# Altium PCB 1700-0002_InterfaceBoard_RevA.PcbDoc (part 2 of 2)
Units mil, origin at the board's own origin, x right, y up, seen from the top; angles counter-clockwise.
Board outline 3850 x 4150 mil, 4 copper layers (Top, GND+Signal, PWR+Signal, Bottom), stack 69.687 mil thick; 247 components, 140 nets, 790 pads, 277 vias.
Unrouted connection lines stored in the file: 103.
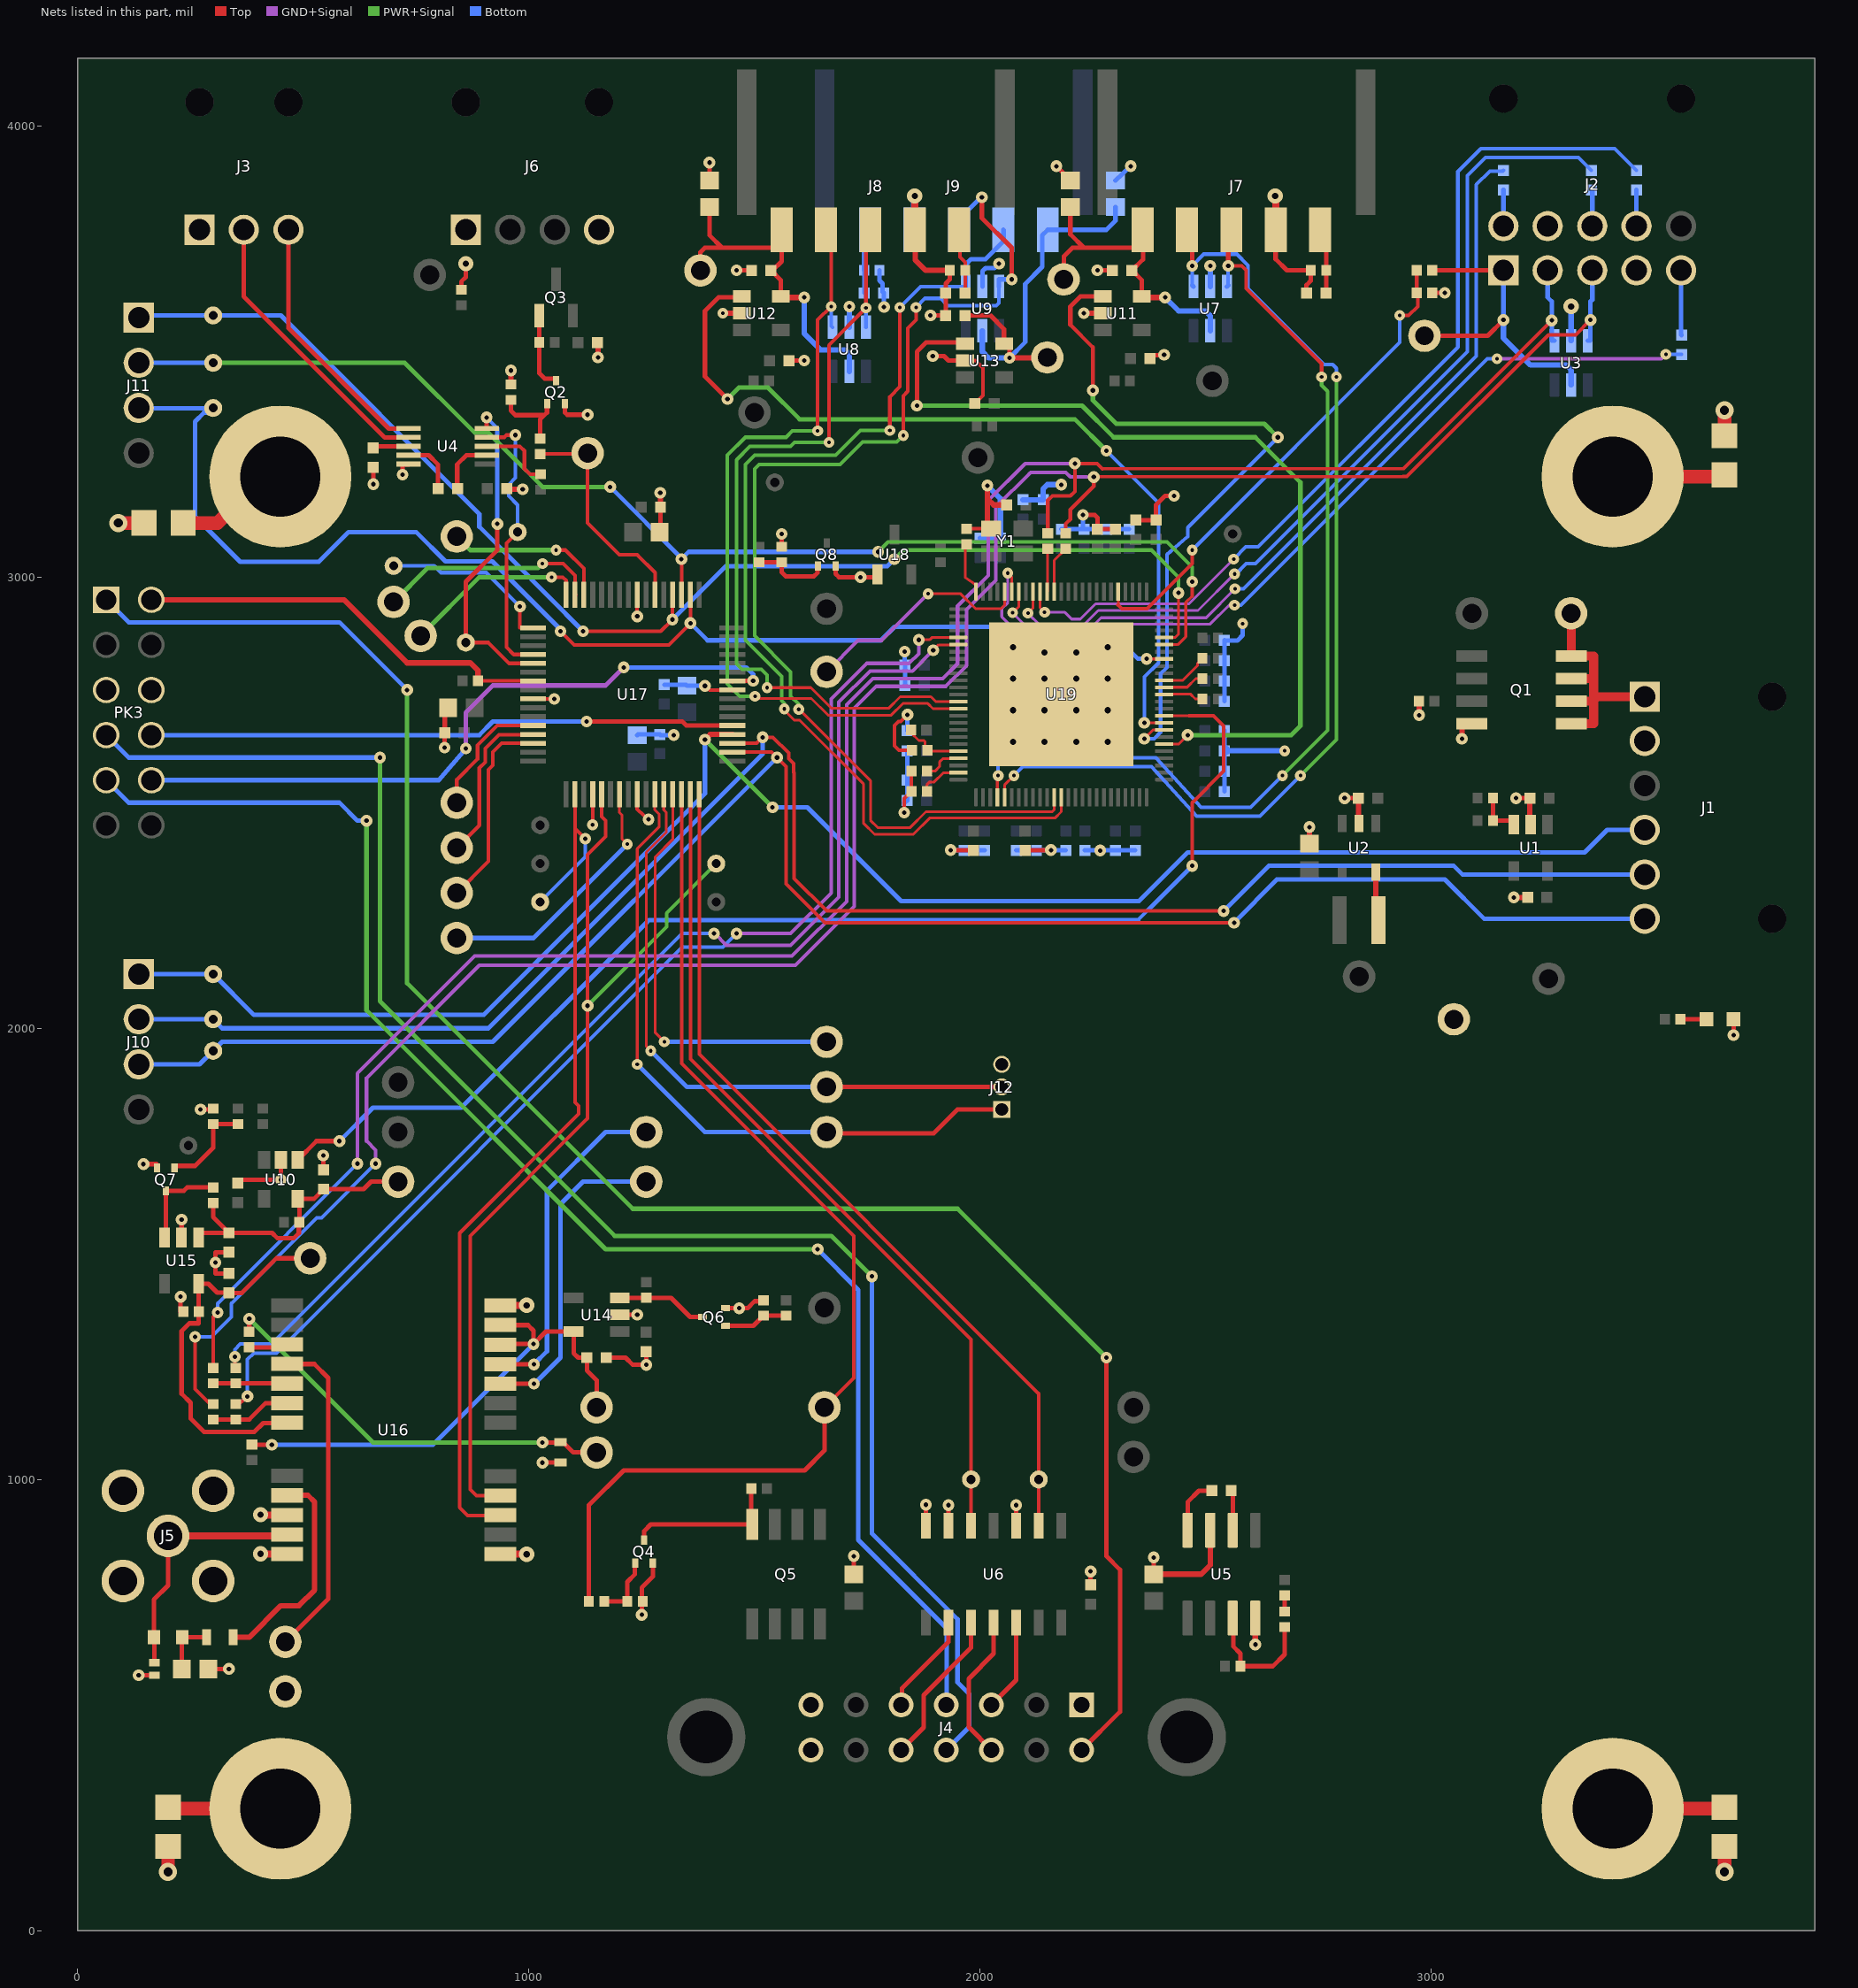
[diagram p4: the nets of this part, all layers, seen from the top]

## Via types
v1: diameter 26/26/26/26 (per signal layer), hole 10, Top to Bottom, 190 vias
v2: diameter 24/24/24/24 (per signal layer), hole 8, Top to Bottom, 54 vias
v3: diameter 34/30/30/34 (per signal layer), hole 14, Top to Bottom, 29 vias
v4: diameter 40/36/36/40 (per signal layer), hole 20, Top to Bottom, 4 vias

## Nets (pads, with @x,y where several pads share a name; then routed paths per layer and width w, separated by ;. In a path a pad name is that pad's centre, name@x,y a point inside that pad or via, vN(x,y) a via of type N, cw(c..) or ccw(c..) an arc to the next point about the centre after c; other vN are vias at no path point) (continued)
GND: 5V_ON.1 C1.2 C2.2 C4.2 C5.2 C6.2 C7.2 C8.2 C9.2 C10.2 C11.2 C12.2 C13.2 C14.2 C15.2 C16.2 C17.2 C18.2 C19.2 C20.2 C21.2 C22.2 C23.2 C24.2 C25.2 C26.2 C27.2 C28.2 C29.2 C30.2 C31.2 C32.2 C33.2 C34.2 C35.2 C36.2 C37.2 C38.2 C39.2 C40.2 C41.2 C42.2 C43.2 C44.2 C45.2 C46.2 C47.2 C48.2 C49.2 C50.2 C51.2 C52.2 C53.2 C54.2 C55.2 C56.2 C58.2 C59.2 C60.1 C61.2 C62.2 C65.1 C66.2 C67.1 C70.2 C71.2 C72.2 C73.2 C74.2 C75.2 C77.2 C78.2 C79.2 C80.2 C81.2 CR1.2 GND.P$1 GNSSGND.P$1 GNSSPULSE.1 J1.2 J2.4 J2.7 J3.1 J4.1 J4.13 J4.14 J5.2 J5.3 J5.4 J5.5 J6.1 J6.4 J7.4 J8.4 J9.4 J12.3 PK3.5 PK3.6 Q1.4 Q2.2 Q4.2 Q6.2 Q7.2 Q8.2 R8.1 R9.2 R10.2 R14.2 R15.2 R21.1 R23.1 R25.2 R31.2 R32.2 R34.2 R40.2 R48.2 R49.2 R50.2 R51.2 R52.1 R53.1 R54.1 R55.1 U1.2 U2.2 U3.2 U4.10 U5.3 U5.8 U6.3 U6.6 U6.7 U7.2 U8.2 U9.2 U10.2 U11.2 U12.2 U13.2 U14.2 U15.2 U16.10 U16.12 U16.13 U16.24 U17.9 U17.20 U17.25 U17.41 U17.56 U18.1 U19.101 Y1.2 | length 7887.5
  Top w8: U17.9@1009,2730.16 1059.84,2730.16 v1(1056,2730) ; v2(1141,2451) 1141.42,2474.58 U17.20@1141.42,2519 ; U17.25@1239.84,2519 1239.84,2486.16 1255,2471 v1(1265,2463) ; U17.56@1239.84,2961 1239.84,2915.16 v1(1240,2913) ; C27.2@1289.53,3100 C27.2@1291.5,3101.97 ; v1@1391,2759 1400,2750 U17.41@1450.84,2750 ; v1(1832,2478) 1832,2509.13 R15.2@1847.87,2525 R34.2@1847.87,2570 ; v1(1839,2695) 1824,2680 1819,2680 1810,2671 1810,2626 1820,2616 R14.2@1848.87,2616 ; C65.1@1923.5,3630 C65.1@1924,3633.5 ; U13.2@1966.69,3480 1990,3480 2006,3464 2006,3402.5 C62.2@1988.5,3385 ; R21.1@1970,3107.13 2024.13,3107.13 Y1.2@2024.57,3107.56 ; C55.2@2260,3106.5 C55.2@2270,3106.5
  Top w10: v1(135,566) CR1.2@170,566 ; v1(145.5,1699) 175,1699 Q7.2@175.5,1690.5 ; v1(228,1405) 228,1372.13 R9.2@233.87,1372 ; U15.2@230,1536.18 v1(230,1576) ; v1(272,1820) 297.87,1820 R49.2@300,1822.13 ; C26.2@289.53,580 v1(335,580) ; C20.2@335,1456.5 305,1456.5 v1(305,1481) 305,1503.5 C19.2@335,1503.5 ; C71.2@355,1656.5 362.5,1664 v1(450,1664) U10.2@450,1708.31 ; v1(544,1718) 544,1686.5 C43.2@545,1686.5 ; v1(655,3206) C13.2@655,3243.5 ; v1(720,3227) 720,3250 733.25,3250 U4.10@733.25,3250.63 ; v1(813,2622) 813,2654.5 C2.2@813.5,2655 813.5,2703.03 C10.2@820.47,2710 ; R10.2@850,3637.13 850,3655 860,3665 v3(860,3695) ; C12.2@950,3195.5 C12.2@950.5,3196 C12.2@951.5,3195 ; v1(1030,1037) 1030.25,1037.25 GNSSPULSE.1@1070,1037.25 ; Q2.2@1079.5,3384.5 1080,3384 1080,3365 1085,3360 v1(1130,3360) ; C75.2@1151.5,3520 C75.2@1153,3520 ; C59.2@1171.5,1270 1214,1270 1230,1254 v1(1260,1254) C50.2@1260,1283.5 ; U14.2@1201.18,1365 v1(1240,1365) ; v1(1250,700) R48.2@1250,730 ; R48.2@1252.13,730 R48.2@1250,730 ; Q4.2@1274.5,814.5 1275,814 1275,785 1250,760 R48.2@1250,730 ; v1(1291,3187) v1@1291.5,3188.5 ; C27.2@1291.5,3101.97 C11.2@1291.5,3155 ; v1(1390,2759) v1@1391,2759 ; C52.2@1400,3879.53 v1(1400,3919) ; Q6.2@1435.5,1379.5 v1(1466,1379.5) 1484.5,1379.5 1500,1395 1517.87,1395 R50.2@1520,1397.13 ; U17.41@1450.84,2750 U17.41@1451,2749.84 ; v1(1460,3680) C61.2@1493.5,3680 ; R51.2@1560,3067.13 v1(1560,3096) ; C58.2@1576.5,3480 v1(1610,3480) ; Q8.2@1679.5,3024.5 1679.5,3007.5 1687,3000 v1(1735,3000) 1766.6,3000 U18.1@1772.6,3006 ; C56.2@1720,789.53 v1(1720,830) ; J8.4@1854.72,3770 J8.4@1871,3753.72 ; U6.7@1880,897.25 v1(1880,944) ; v1(1890,3580) C66.2@1923.5,3580 1924,3583.5 1924,3633.5 1924,3651 1932.87,3659.87 R32.2@1932.87,3680 ; v1(1895,3490) 1920,3490 1930,3480 U13.2@1966.69,3480 ; U6.6@1930,897.25 v1(1930,943) ; v1(1935,2395) 1955.5,2394.5 C44.2@1985,2394.5 ; Y1.2@2016,3106.13 2022.13,3100 Y1.2@2024.57,3107.56 ; U6.3@2080,897.25 v1(2080,943) ; C53.2@2100,2394.5 2156.5,2394.5 v1(2157,2395) ; v1(2169,3911) 2200,3881 C70.2@2200,3879.53 ; U19.101@2180,2740 2213,2707 v3(2213,2705) ; v3(2213,2635) v3(2283,2635) ; v3(2213,2833) v3(2143,2833) v3(2143,2775) v3(2283,2775) v3(2283,2845) ; v1(2228,3138) 2254,3138 2260,3132 C55.2@2260,3106.5 ; v1@2230,3580 v1(2230,3585) ; C34.2@2245,766.5 v1(2245,796) ; v1(2260,3680) C54.2@2293.5,3680 ; C55.2@2270,3106.5 C25.2@2300,3106.5 C25.2@2300,3110 ; C47.2@2345,3126.5 C29.2@2390,3126.5 2390,3160 2410,3180 v1(2430,3180) ; C33.2@2376.5,3485 2383.5,3492 2402,3492 v1(2408,3493) ; v1(2385,827) C32.2@2385,789.53 C32.2@2385.47,790 ; J7.4@2655.28,3770 2655,3769.72 2655,3705 2680,3680 R40.2@2732.87,3680 ; C67.1@2723.5,3630 2723.5,3647.5 2733,3657 2733,3679.87 R40.2@2732.87,3680 ; R40.2@2723.5,3680 R40.2@2732.87,3680 ; v1(2808,2510) C74.2@2838.5,2510 ; U2.2@2838.5,2455.25 U2.2@2840,2453.75 ; R23.1@3002.13,3630 v1(3030,3630) ; Q1.4@3089.76,2670 Q1.4@3089.76,2675 ; v1(3188,2510) C72.2@3218.5,2510 ; U1.2@3218.5,2452.68 U1.2@3220,2451.18 ; v1(3670,1985) 5V_ON.1@3670,2020
  Top w12: C12.2@951.5,3195 v1(986,3195) ; R31.2@960,3427.13 v1(960,3458) ; v1(1153,3487) C75.2@1153,3520 ; C11.2@1291.5,3155 v1@1291.5,3188.5 ; v2(1430,3585) U12.2@1471.69,3585 ; J8.4@1854.72,3770 1856,3768.72 1856,3703 1879,3680 R32.2@1932.87,3680 ; Y1.2@2016,3106.13 2016,3174 ; v1(2016,3203) 2016,3174 ; C49.2@2058.5,3160 2030,3160 2016,3174 ; v1(2230,3585) U11.2@2271.69,3585 ; C32.2@2385.47,790 2490,790 2510,810 U5.3@2510,887.44 ; v1(2610,634) U5.8@2610,692.56 ; C80.2@2730,2409.53 v1(2730,2446) ; U2.2@2838.5,2455.25 C74.2@2838.5,2510 ; R8.1@2972.87,2725 2973.13,2720.87 v1(2973,2694) ; v1(3068,2642) 3068,2670 Q1.4@3089.76,2670 ; v1(3183,2290) C73.2@3213.5,2290 ; U1.2@3218.5,2452.68 C72.2@3218.5,2510
  Top w16: v3(405,835) 408.43,834.57 U16.12@463.76,834.57 ; v3(405,922) 407.81,921.19 U16.10@463.76,921.19 ; U16.13@936.24,834.25 985.75,834.25 v3(995,834) ; U16.24@936.24,1385.43 998.43,1385.43 v3(995,1386) ; v3(1855,3845) 1855.28,3844.72 J8.4@1855.28,3770 ; v3(2654,3845) 2655.28,3843.72 J7.4@2655.28,3770
  Top w30: v4(90,3120) R53.1@146.69,3120 ; v4(200,130) R54.1@200,186.69 ; v4(3650,130) R55.1@3650,186.69 ; R52.1@3650,3313.31 v4(3650,3370)
  Bottom w8: v1(1832,2478) C41.2@1832,2499.5 ; C41.2@1835,2505 C41.2@1838.5,2505
  Bottom w10: C79.2@1240,2649.53 1241.97,2651.5 C78.2@1290,2651.5 1291.5,2650 v1(1321,2650) ; C1.2@1300,2761.5 1348.03,2761.5 C77.2@1350,2759.53 1389.47,2759.53 v1(1390,2759) ; R25.2@1777.13,3680 1777.13,3657.87 1784,3651 1784,3632.5 C60.1@1786.5,3630 1786.5,3603.5 v1(1787,3599) ; C41.2@1832,2499.5 C41.2@1838.5,2505 C42.2@1838.5,2615 C36.2@1838.5,2550 C36.2@1839,2550 ; v1(1833,2835) 1833,2810.5 C30.2@1833.5,2805 C46.2@1833.5,2760 ; C35.2@1838.5,2660 1838.5,2694.5 v1(1839,2695) ; v1(1935,2395) 1955.5,2394.5 C4.2@1965,2394.5 C7.2@2010,2394.5 ; C5.2@2000,3086.5 C8.2@2045,3086.5 ; U9.2@2005,3644 2005,3678 2012,3685 2032,3685 v1(2042,3695) ; C39.2@2080,2394.5 C38.2@2124.5,2394.5 ; C38.2@2125,2394.5 C38.2@2124.5,2394.5 ; C24.2@2180,3106.5 C22.2@2230,3106.5 ; C48.2@2190,2394.5 2157.5,2394.5 v1(2157,2395) 2125,2395 C38.2@2124.5,2394.5 ; C22.2@2224,3106.5 C22.2@2228,3106.5 ; v1(2228,3138) C22.2@2228,3106.5 ; C28.2@2232,2394.5 2266.5,2394.5 v1(2266,2394) 2267.5,2394.5 C21.2@2300,2394.5 C81.2@2344,2394.5 ; C51.2@2300,3879.53 2332.53,3909.53 v1(2334,3911) ; C16.2@2330,3106.5 C23.2@2280,3106.5 C22.2@2230,3106.5 ; C9.2@2541.5,2525 C6.2@2541.5,2570 C45.2@2541.5,2615 C31.2@2541.5,2660 ; C14.2@2541.5,2725 C17.2@2541.5,2770 C15.2@2541.5,2815 C18.2@2541.5,2860 2558.5,2859.5 2570.5,2859.5 2582,2871 v2(2582,2897) ; C22.2@2228,3106.5 C22.2@2230,3106.5
  Bottom w12: U8.2@1710,3554 v1(1710,3600) ; v1(2016,3203) 2045,3174 C8.2@2045,3086.5 ; C40.2@2095,3171.5 C37.2@2140,3171.5 2140,3196 2149,3205 v1(2180,3205) ; U7.2@2510,3644 v1(2510,3690) ; C45.2@2541.5,2615 2546.5,2620 2547,2612 2550,2615 v2(2675,2615) ; U3.2@3310,3524 v3(3310,3600)
  Bottom w16: J9.4@1854.72,3770 1854.72,3844.72 v3(1855,3845)
  other v3: 2073,2635 2143,2635 2073,2705 2143,2705 2283,2705 2073,2775 2213,2775 2073,2845
GNSS_ANT: CR1.1 J5.1 L2.1 U16.11 | length 559.6
  Top w10: CR1.1@170,594 170,648.5 L2.1@168.5,650 168.5,733.5 200,765 J5.1@200,875
  Top w16: J5.1@200,875 460.88,875 U16.11@463.76,877.88
GNSS_ANT_DET: GNSSANTDET.P$1 GNSSANTDET.P$2 U16.15 U17.18 | length 2081.6
  Top w8: U16.15@936.24,920.86 935.38,920 864,920 846,938 846,1546 1110,1810 1110,1828 1102.05,1835.95 U17.18@1102.05,2519 1102.05,2442.95 v1(1125,2420)
  Bottom w8: GNSSANTDET.P$2@1025,2280 1125,2380 v1(1125,2420)
GNSS_ANT_OK: GNSSANTOK.P$1 GNSSANTOK.P$2 U16.16 U17.21 | length 2174.1
  Top w8: U16.16@936.24,964.17 936.08,964 884,964 870,978 870,1540 1130,1800 v1(1130,2050) 1130,2385 1170,2425 1170,2460 1161.1,2468.9 U17.21@1161.1,2519
  PWR+Signal w8: v1(1130,2050) 1305,2225 1305,2255 GNSSANTOK.P$2@1415,2365
GNSS_VCC_3V3: C59.1 GNSS3V3.P$1 R7.2 U14.5 U16.22 U16.23 | length 1199.9
  Top w10: R7.2@386,1077.13 429.87,1077.13 v1(430,1077) ; U16.22@936.24,1298.81 937.43,1300 v1(1010,1300) ; U16.23@936.24,1342.12 997.88,1342.12 1010,1330 v1(1010,1300) ; GNSS3V3.P$1@1150,1160 1150,1220 1128.5,1241.5 C59.1@1128.5,1270 1109,1270 1099,1280 1099,1327.42 U14.5@1098.82,1327.6 1037.6,1327.6 v1(1010,1300)
  Bottom w10: v1(430,1077) 787,1077 v1(1010,1300)
GNSS_VDDUSB_3V3: C20.1 GNSSVDDU.P$1 R9.1 U15.5 U16.7 | length 858
  Top w10: U16.7@463.76,1125.91 462.84,1125 411,1125 391,1105 280,1105 250,1135 250,1170 230,1190 230,1329 247,1346 268,1346 268.13,1361.13 R9.1@268.13,1372 268.13,1433.09 U15.5@267.4,1433.82 289.18,1433.82 309,1414 334.5,1414 C20.1@335,1413.5 363.5,1413.5 440,1490 GNSSVDDU.P$1@515,1490
MB_PWR_EN: MBPWREN.P$1 R1.1 U17.30 | length 2425.2
  Top w8: U17.30@1338.27,2519 1338.27,1921.73 1720,1540 1720,1225 MBPWREN.P$1@1655,1160
  Top w10: R1.1@1132.87,730 1132.87,942.87 1210,1020 1611,1020 1655,1064 MBPWREN.P$1@1655,1160
N$1: L1.2 U2.5 | length 112.1
  Top w10: L1.2@2877.4,2240 L1.2@2883.25,2240
  Top w12: L1.2@2877.4,2240 U2.5@2877.4,2346.25
N$2: C3.1 U4.9 | length 127.4
  Top w10: U4.9@733.25,3270.31 777.68,3270.32 798,3250 798,3196.5 C3.1@798.5,3196
N$3: PTH1.P$1 R52.2 | length 249.5
  Top w30: PTH1.P$1@3402,3223 3646.31,3223 R52.2@3650,3226.69
N$4: C3.2 U4.2 | length 128.4
  Top w10: C3.2@841.5,3196 841,3196.5 841,3250 861.32,3270.32 U4.2@906.75,3270.31
N$5: C13.1 U4.8 | length 79.7
  Top w10: C13.1@655,3286.5 658.5,3290 U4.8@733.25,3290
N$6: R29.2 R30.1 U1.3 | length 104.3
  Top w10: R30.1@3137.13,2510 R29.2@3137.13,2460 3182.6,2460 U1.3@3182.6,2451.18
N$7: PIC_RF6.P$1 U17.12 | length 287.3
  Top w8: PIC_RF6.P$1@840,2500 840,2551 886,2597 886,2627 930.1,2671.1 U17.12@1009,2671.1
N$8: PTH2.P$1 R53.2 | length 258.4
  Top w30: R53.2@233.31,3120 310,3120 340,3150 376,3150 PTH2.P$1@449,3223
N$9: Q2.3 Q3.1 R5.1 | length 172.2
  Top w10: Q3.1@1022.6,3580 1022.87,3580 R5.1@1022.87,3520 1023,3519.87 1023,3452 1035,3440 1055.5,3440 Q2.3@1060,3435.5
N$10: Q2.1 R31.1 R41.1 | length 185.8
  Top w10: R31.1@960,3392.87 960,3369 970,3359 1034,3359 ; R41.1@1025,3307.13 1025,3350 1034,3359 ; Q2.1@1040.5,3384.5 1040,3384 1040,3365 1034,3359
N$11: R2.1 R45.1 U16.6 | length 178.8
  Top w10: R45.1@300,1132.87 R2.1@350,1132.87 350.13,1133 380,1133 416.22,1169.22 U16.6@463.76,1169.22
N$12: R3.1 R46.1 U16.5 | length 171.5
  Top w8: R3.1@347,1210.13 R3.1@350,1212.87
  Top w10: R46.1@300,1212.87 R3.1@350,1212.87 463.41,1212.87 U16.5@463.76,1212.53 U16.5@461.23,1210
N$13: Q6.3 R6.1 U14.3 | length 201.5
  Top w10: U14.3@1201.18,1402.4 R6.1@1259.53,1402.4 ; R6.1@1260,1402.87 R6.1@1259.53,1402.4 ; Q6.3@1384.5,1360 1357.4,1360 1315,1402.4 R6.1@1259.53,1402.4
N$14: GNSSTX.P$1 U16.20 | length 708.6
  Top w10: U16.20@936.24,1212.2 1010.8,1212.2 v1(1011,1212)
  Bottom w10: v1(1011,1212) 1012,1212 1070,1270 1070,1610 1120,1660 GNSSTX.P$1@1260,1660
N$15: PTH3.P$1 R54.2 | length 252.3
  Top w30: R54.2@200,273.31 200,270 PTH3.P$1@449,270
N$16: Q6.1 R35.2 R50.1 | length 143.8
  Top w10: Q6.1@1435.5,1340.5 1497.63,1340.5 R50.1@1520,1362.87 R35.2@1570,1362.87
N$17: Q7.3 R47.2 U15.3 | length 213.9
  Top w10: U15.3@192.6,1536.18 195,1536.18 Q7.3@195,1639.5 195.5,1640 235,1640 242.13,1647.13 R47.2@300,1647.13
N$18: C60.2 J9.5 R25.1 | length 145.8
  Bottom w10: C60.2@1743.5,3630 1743.5,3679.37 R25.1@1742.87,3680 1742.87,3756.57 J9.5@1756.3,3770
N$19: PTH4.P$1 R55.2 | length 251.3
  Top w30: PTH4.P$1@3402,270 3650,270 R55.2@3650,273.31
N$20: TXD2.P$1 U17.4 | length 331.2
  Top w8: TXD2.P$1@975,3100 950,3075 950,2845 966.42,2828.58 U17.4@1009,2828.58
N$21: Q4.3 Q5.4 R13.2 | length 347.8
  Top w10: Q4.3@1255,865.5 1255,885.24 1270,900.24 Q5.4@1495,900.24 1492.87,900.24 R13.2@1492.87,980
N$22: C65.2 J8.5 R32.1 | length 146.2
  Top w8: J8.5@1953.7,3770 1955,3768.7 1955,3710 1967.13,3697.87 R32.1@1967.13,3680 1967.13,3630 C65.2@1966.5,3630
N$23: R37.1 R39.2 U5.7 | length 283.2
  Top w10: U5.7@2560,692.56 2561,691.56 2561,630 2577.13,613.87 R37.1@2577.13,586 2649,586 2675,612 R39.2@2675,672.87
N$24: C69.1 J2.9 | length 80.5
  Bottom w10: J2.9@3455,3778 C69.1@3455,3858.5
N$25: C68.1 J2.8 | length 81.3
  Bottom w10: C68.1@3355,3858.5 3357,3856.5 J2.8@3357,3778
N$26: C64.1 J2.6 | length 80.5
  Bottom w10: J2.6@3160,3778 C64.1@3160,3858.5
N$27: C63.1 J2.5 | length 143.9
  Bottom w10: J2.5@3554,3680 3554,3537.5 C63.1@3555,3536.5
N$28: R14.1 R24.2 U19.21 | length 136.7
  Top w6: R24.2@1846.87,2661 1846.87,2655.13 1864,2638 1876,2638 1878,2636 1878,2621.13 R14.1@1883.13,2616 1885.11,2614.02 U19.21@1952,2614.02
N$29: R34.1 U19.22 | length 87.4
  Top w6: R34.1@1882.13,2570 1900,2570 1910,2580 1910,2590 1918,2598 1951.73,2598 U19.22@1952,2598.27
N$30: R15.1 U19.24 | length 96
  Top w6: R15.1@1882.13,2525 1882.13,2540.13 1888,2546 1898,2546 1918,2566 1951.23,2566 U19.24@1952,2566.77
N$31: R20.2 U19.63 | length 89.8
  Top w6: U19.63@2408,2740 2409,2741 2466,2741 2477,2730 R20.2@2492.87,2730
N$32: R19.2 U19.65 | length 108
  Top w6: U19.65@2408,2771.5 2449.5,2771.5 2482,2804 2482,2809.13 R19.2@2492.87,2820
N$33: R21.2 U19.100 | length 120.9
  Top w6: R21.2@1970,3072.87 1967.13,3072.87 1967,3073 1967,2999 1991.02,2983 U19.100@1991.02,2968
N$34: R16.2 U19.64 | length 92.8
  Top w6: U19.64@2408,2755.75 2408.25,2756 2459,2756 2478,2775 R16.2@2492.87,2775
N$35: ATEST.P$1 U19.96 | length 512.6
  Top w6: v2(1885,2963) 1957,2963 1990,2930 2046,2930 2054.02,2938.02 U19.96@2054.02,2968
  GND+Signal w8: ATEST.P$1@1660,2790 1730,2860 1782,2860 v2(1885,2963)
N$36: Q4.1 R1.2 R48.1 | length 142.9
  Top w10: R1.2@1167.13,730 R48.1@1217.87,730 ; R48.1@1217.5,730 R48.1@1217.87,730 ; Q4.1@1235.5,814.5 1235,814 1235,790 1217.87,772.87 R48.1@1217.87,730
N$37: PIC_RF5.P$1 U17.13 | length 365
  Top w8: PIC_RF5.P$1@840,2400 890,2450 890,2577 903,2590 903,2620 934,2651 1007.58,2651 U17.13@1009,2651.42
N$38: GNSSRX.P$1 U16.21 | length 745.8
  Top w10: U16.21@936.24,1255.51 1010.49,1255.51 v1(1011,1255)
  Bottom w10: v1(1011,1255) 1040,1284 1040,1640 1170,1770 GNSSRX.P$1@1260,1770
N$39: PIC_RF4.P$1 U17.14 | length 442.3
  Top w8: PIC_RF4.P$1@840,2300 910,2370 910,2573 920,2583 920,2612 939.73,2631.73 U17.14@1009,2631.73
N$40: PIC_RA1.P$1 U17.23 | length 582.4
  Top w6: U17.23@1200.47,2519 1200.47,2478.53 1206,2473 1206,2420 v2(1218,2408)
  Bottom w10: PIC_RA1.P$1@840,2200 1010,2200 v2(1218,2408)
N$41: R33.1 U16.3 | length 86.4
  Top w10: R33.1@380,1292.87 457.49,1292.87 U16.3@463.76,1299.14
N$42: GNSSINT.P$1 U16.4 | length 728.4
  Top w10: GNSSINT.P$1@460,640 555,735 555,1225 524.17,1255.83 U16.4@463.76,1255.83
N$43: RXD2.P$1 U17.5 | length 168.1
  Top w8: RXD2.P$1@860,2855 910,2855 956.1,2808.9 U17.5@1009,2808.9
N$44: R12.1 R39.1 | length 35.7
  Top w10: R39.1@2675,707.13 R12.1@2675,742.87
N$45: C76.1 U5.2 | length 89
  Top w10: C76.1@2556.5,975 2560,971.5 U5.2@2560,887.44
N$46: C76.2 U5.4 | length 126.4
  Top w10: U5.4@2460,887.44 2460,950 2485,975 C76.2@2513.5,975
N$47: SS2AUX.P$1 U17.1 | length 393.6
  Top w8: v1(980,2935) 980,2887.64 U17.1@1009,2887.64
  Bottom w8: SS2AUX.P$1@700,3025 790,3025 805,3010 905,3010 v1(980,2935)
N$48: J12.1 PIC_RA5.P$1 U17.27 | length 1516.7
  Top w6: v2(1240,1920) 1240,2398 1289,2447 1289,2474 1279.21,2483.79 U17.27@1279.21,2519
  Top w10: PIC_RA5.P$1@1660,1770 1663,1767 1897,1767 1950,1820 J12.1@2048,1820
  Bottom w10: v2(1240,1920) 1390,1770 PIC_RA5.P$1@1660,1770
N$49: J12.2 PIC_RA4.P$1 U17.28 | length 1404.6
  Top w6: v2(1270,1950) 1260,1960 1260,2390 1304,2434 1304,2479 1298.9,2484.1 U17.28@1298.9,2519
  Top w10: PIC_RA4.P$1@1660,1870 J12.2@2048,1870
  Bottom w10: v2(1270,1950) 1350,1870 PIC_RA4.P$1@1660,1870
N$50: 5V_ON.2 R56.1 | length 57.9
  Top w10: R56.1@3552.13,2020 5V_ON.2@3610,2020
N$51: GNSSPLS.P$1 GNSSPULSE.2 R33.2 | length 921.9
  Top w10: R33.2@380,1327.13 v1(380,1356) ; v1(1030,1082) 1067.25,1082 GNSSPULSE.2@1070,1082.75 1075.25,1082.75 1098,1060 GNSSPLS.P$1@1150,1060
  PWR+Signal w10: v1(380,1356) 654,1082 v1(1030,1082)
N$52: C67.2 J7.5 R40.1 | length 145.8
  Top w10: J7.5@2753.7,3770 2767.13,3756.57 R40.1@2767.13,3680 2767.13,3630.63 C67.2@2766.5,3630
N$53: PIC_RC1.P$1 U17.29 | length 933.3
  Top w6: v2(1300,1970) 1280,1990 1280,2380 1318.58,2418.58 U17.29@1318.58,2519
  Bottom w10: v2(1300,1970) PIC_RC1.P$1@1660,1970
N$54: PIC_RE2.P$1 U17.64 | length 410.9
  Top w8: v2(1050,3000) 1075,3000 1082.36,2992.64 U17.64@1082.36,2961
  PWR+Signal w10: PIC_RE2.P$1@760,2870 890,3000 v2(1050,3000)
N$55: PIC_RE3.P$1 U17.63 | length 491
  Top w8: v2(1030,3030) 1076,3030 1102,3004 U17.63@1102.05,2961
  Top w10: U17.63@1102.05,2961 U17.63@1102.05,2961
  PWR+Signal w10: PIC_RE3.P$1@700,2945 775,3020 1020,3020 v2(1030,3030)
N$56: PIC_RE4.P$1 U17.62 | length 369.5
  Top w8: v2(1060,3060) 1081,3060 1122,3019 1122,2961.27 U17.62@1121.73,2961
  PWR+Signal w10: PIC_RE4.P$1@840,3090 870,3060 v2(1060,3060)
N$57: R44.1 U4.3 | length 168.3
  Top w8: U4.3@906.75,3290 980,3290 990,3280 990,3240 1001.87,3228.13 R44.1@1026,3228.13
N$59: C26.1 L2.2 R57.1 | length 124.1
  Top w10: C26.1@230.47,580 230.47,646.02 L2.2@231.5,650 R57.1@285.47,650
PC_USB2_HOST_DM: J2.2 R43.2 R46.2 U3.1 | length 4930.9
  Top w6: R43.2@2150,3096.13 R43.2@2150,3097.13
  Top w8: R46.2@300,1247.13 300,1360 v1(310,1370) ; R43.2@2150,3097.13 2150,3170 2160,3180 2200,3180 2210,3190 v1(2210,3252) 2259,3252 2271,3240 2939,3241 v1(3267,3569)
  GND+Signal w8: v1(620,1700) 620,1900 880,2160 1583,2160 1704,2281 1704,2717 1762,2775 1917,2775 1950,2808 1950,2936 2018,3004 2018,3170.5 2100,3252 v1(2210,3252)
  Bottom w8: v1(310,1370) 310,1390 v1(620,1700)
  Bottom w10: J2.2@3258,3680 3258,3620 3267,3611 v1(3267,3569) 3267,3524 U3.1@3273,3524
PC_USB2_HOST_DP: J2.3 R18.2 R45.2 U3.3 | length 5100.5
  Top w8: v1(260,1316) 260,1200 292.87,1167.13 R45.2@300,1167.13 ; R18.2@2190,3097.13 2190,3118 2200,3128 2200,3150 2252,3202 v1(2252,3222) 2938,3223 2946,3223 3260,3537 3320,3537 v1(3353,3570)
  GND+Signal w8: v1(660,1700) 660,1730 640,1750 640,1890 890,2140 1591,2140 1721,2270 1721,2709 1770,2758 1924,2758 1970,2804 1970,2928 2035,2993 2035,3156 2109.84,3230.16 2112,3232 2190,3232 2200,3222 v1(2252,3222)
  Bottom w8: v1(260,1316) 296,1316 340,1360 340,1390 530,1580 540,1580 v1(660,1700)
  Bottom w10: U3.3@3347,3524 3353,3524 v1(3353,3570) 3353,3611 3357,3615 J2.3@3357,3680
PC_VBUS: J2.1 PCVBUS.P$1 R22.2 U3.5 | length 710.4
  Top w10: PCVBUS.P$1@2985,3535 3125,3535 v1(3160,3570) ; R22.2@3002.13,3680 J2.1@3160,3680
  Bottom w10: v1(3160,3570) J2.1@3160,3680
  Bottom w12: v1(3160,3570) 3160,3530 3220,3470 3300,3470 3310,3460 U3.5@3310,3426
PRT_CTL1: U10.1 U19.60 | length 2733.2
  Top w6: U19.60@2408,2692.76 2408.24,2693 2463,2693
  Top w8: 2463,2693 2517,2693 2540,2670 2540,2570 2470,2500 v1(2470,2360)
  Top w10: U10.1@487.4,1708.31 529.09,1750 v1(580,1750)
  Bottom w8: 2350,2240 2372,2262
  Bottom w10: v1(580,1750) 654,1824 850,1824 1258,2232 1266,2240 2350,2240 ; 2372,2262 v1(2470,2360)
PRT_CTL2: U11.1 U19.58 | length 1610.9
  Top w6: v1(2364,2642) 2383,2661 2388.74,2661 U19.58@2408,2661.26
  Top w8: 2200,3560 2250,3510 v1(2250,3414)
  Top w10: 2200,3560 2200,3600 2222.4,3622.4 U11.1@2271.69,3622.4
  PWR+Signal w10: v1(2250,3414) 2250,3392 2302,3340 2630,3340 v1(2660,3310)
  Bottom w8: v1(2364,2642) 2386,2642 2400,2656 2400,2786 2414,2800 2414,3050 2460,3090 2460,3110 v1(2660,3310)
PRT_CTL3: U12.1 U19.59 | length 1927.8
  Top w6: v1(2364,2677) 2366.99,2677.01 U19.59@2408,2677.01
  Top w8: U12.1@1469.29,3620 U12.1@1471.69,3622.4
  Top w10: v1(1440,3395) 1390,3445 1390,3590 1420,3620 U12.1@1469.29,3620
  PWR+Signal w10: v1(1440,3395) 1465,3420 1530,3420 1600,3350 2210,3350 v1(2280,3280)
  Bottom w8: v1(2280,3280) 2396,3164 2396,2810 2364,2779 v1(2364,2677)
PRT_CTL4: U13.1 U19.56 | length 2015.1
  Top w6: U19.56@2408,2629.76 2439.76,2629.76 v1(2460,2650)
  Top w10: v1(1860,3380) 1860,3500 1880,3520 1964.09,3520 U13.1@1966.69,3517.4
  PWR+Signal w10: v1(1860,3380) 2226,3380 2296,3310 2610,3310 2710,3210 2710,2670 2690,2650 v1(2460,2650)
PWR_BYP2: Q7.1 R11.2 R49.1 | length 214.4
  Top w10: Q7.1@214.5,1690.5 214.5,1695 260,1695 300,1735 R49.1@300,1787.87 R11.2@355,1787.87
PWR_BYP3: Q8.1 R36.2 R51.1 | length 173.6
  Top w10: R36.2@1510,3032.87 R51.1@1560,3032.87 1560,3011 1569,3002 1632,3002 1640,3010 1640,3024 Q8.1@1640.5,3024.5
PWR_IN_5V: 5VIN.P$1 J1.1 Q1.5 Q1.6 Q1.7 Q1.8 | length 558.5
  Top w10: 5VIN.P$1@3310,2920 5VIN.P$1@3310.24,2920
  Top w20: Q1.5@3310.24,2675 3360,2675 3360,2725 ; Q1.6@3310.24,2725 3360,2725 ; Q1.7@3310.24,2775 3360,2775 ; 5VIN.P$1@3310.24,2920 Q1.8@3310.24,2825 3360,2825 3360,2775 ; J1.1@3473,2735 3370,2735 3360,2730 ; 3360,2725 3360,2730 ; 3360,2730 3360,2775
RB6(PGC)_IB: PK3.10 U17.42 | length 1555
  Top w10: U17.42@1451,2769.53 1451.47,2770 v1(1497,2770)
  GND+Signal w10: v1(860,2620) 860,2700 920,2760 1170,2760 v1(1210,2800)
  Bottom w10: PK3.10@163,2550 800,2550 v1(860,2620) ; v1(1210,2800) 1482,2800 1497,2785 v1(1497,2770)
RB6(PGC)_MB: J4.7 PK3.9 | length 3382.7
  PWR+Signal w10: v1(640,2460) 640,2040 1170,1510 v1(1640,1510)
  Bottom w10: PK3.9@63,2550 113,2500 580,2500 620,2460 v1(640,2460) ; v1(1640,1510) 1730,1420 1730,866 1926,670 1926,501 J4.7@1925,500
RB7(PGD)_IB: PK3.8 U17.37 | length 1304.1
  Top w10: v1(1128,2680) 1340,2680 1348.9,2671.1 U17.37@1451,2671.1
  Bottom w10: PK3.8@163,2650 890,2650 920,2680 v1(1128,2680)
RB7(PGD)_MB: J4.8 PK3.7 | length 3671
  PWR+Signal w10: v1(670,2600) 670,2060 1190,1540 1670,1540 v1(1760,1450)
  Bottom w10: PK3.7@63,2650 113,2600 v1(670,2600) ; v1(1760,1450) 1760,880 1950,690 1950,550 1976,524 1976,451 J4.8@1925,400
RS232_CH1_IN: J3.3 U4.6 | length 576.5
  Top w10: J3.3@467,3770 467,3552 689.63,3329.37 U4.6@733.25,3329.37
RS232_CH1_OUT: J3.2 U4.7 | length 642.6
  Top w10: J3.2@368,3770 368,3622 680.32,3309.69 U4.7@733.25,3309.69
RX+: J4.5 U6.12 | length 205.5
  Top w10: J4.5@2025,500 2080,555 U6.12@2080,682.75
RX-: J4.6 U6.11 | length 325.7
  Top w10: J4.6@2025,400 1975,451 1975,558 2030,614 U6.11@2030,682.75
SPI1_SCK: J1.6 J10.3 SCK1.P$1 SCK1.P$2 U17.34 | length 4103.7
  Top w8: U17.34@1451,2612.05 1537.95,2612.05 v1(1550,2600) 1570,2580 1570,2320 1656,2234 v1(2563,2234)
  Bottom w10: J10.3@135,1920 270,1920 SCK1.P$2@300,1950 320,1970 920,1970 v1(1550,2600) ; v1(2563,2234) 2658,2330 3030,2330 3117,2243 J1.6@3473,2243
SPI1_SDI: J1.5 J10.2 SDI1.P$1 SDI1.P$2 U17.35 | length 4072.2
  Top w8: U17.35@1451,2631.73 1504.73,2631.73 v1(1518,2645) 1541,2645 1576,2610 1576,2598 1587,2587 1587,2567 1588,2566 1588,2332 1660,2260 v1(2540,2260)
  Bottom w10: J10.2@135,2020 SDI1.P$2@300,2020 320,2000 910,2000 1518,2608 v1(1518,2645) ; v1(2540,2260) 2640,2360 3050,2360 3069,2341 J1.5@3473,2341
SPI1_SDO: J1.4 J10.1 SDO1.P$1 SDO1.P$2 U17.36 | length 3977.7
  Top w12: v1(1390,2640) 1401.42,2651.42 U17.36@1451,2651.42
  PWR+Signal w10: v1(1390,2640) v1(1540,2490)
  Bottom w10: J10.1@135,2120 SDO1.P$2@300,2120 390,2030 900,2030 1390,2520 v1(1390,2640) ; v1(1540,2490) 1617,2490 1825,2282 2352,2282 2460,2390 3340,2390 3390,2440 J1.4@3473,2440
SPI2_SCK: J11.3 SCK2.P$1 SCK2.P$2 U17.50 U19.68 | length 2892.7
  Top w6: v1(2369,2819) 2375.26,2818.74 U19.68@2408,2818.74
  Top w8: v1(1070,2880) 1100,2850 1310,2850 v1(1357.95,2897.95) U17.50@1357.95,2961
  Bottom w8: J11.3@135,3375 J11.3@136,3374
  Bottom w10: J11.3@136,3374 299,3374 SCK2.P$2@300,3375 290,3365 280,3365 260,3345 260,3134 360,3034 534,3034 600,3100 750,3100 815,3035 919,3035 1070,2884 v1(1070,2880) ; v1(1357.95,2897.95) 1395.91,2860 1780,2860 1810,2890 2280,2890 2350,2819 v1(2369,2819)
SPI2_SDI: J11.2 SDI2.P$1 SDI2.P$2 U17.51 U19.70 | length 2849.6
  Top w6: U19.70@2408,2850.24 2438.24,2850.24 2456,2868 2456,2944 2470,2958
  Top w8: v1(1338,3040) 1338.27,3039.73 U17.51@1338.27,2961 ; 2470,2958 v1(2470,2990)
  PWR+Signal w8: v1(1774,3056) 1796,3078 2414,3078 2470,3022 v1(2470,2990)
  PWR+Signal w10: SDI2.P$2@300,3475 725,3475 880,3320 910,3320 1030,3200 v1(1180,3200)
  Bottom w8: v1(1338,3040) v1@1338,3042
  Bottom w10: J11.2@135,3475 SDI2.P$2@300,3475 ; v1(1180,3200) v1@1338,3042 ; v1(1338,3040) 1354,3056 v1(1774,3056)
SPI2_SDO: J11.1 SDO2.P$1 SDO2.P$2 U17.52 U19.71 | length 2930
  Top w6: U19.71@2408,2865.98 2431.98,2865.98 2440,2874 v1(2440,2965)
  Top w8: v1(1120,2880) 1292,2880 v1(1318,2906) 1318,2960.42 U17.52@1318.58,2961
  PWR+Signal w8: v1(1810,3040) 1830,3060 2380,3060 2440,3000 v1(2440,2965)
  Bottom w8: J11.1@135,3575 J11.1@140,3580
  Bottom w10: J11.1@140,3580 SDO2.P$2@300,3580 450,3580 890,3140 890,3112 v1(1120,2880) ; v1(1318,2906) 1436,3024 1794,3024 v1(1810,3040)
TEMP_PWR_EN: R41.2 TMPWREN.P$1 U17.54 | length 505.8
  Top w8: R41.2@1025,3272.87 1127.87,3272.87 TMPWREN.P$1@1130,3275 1130,3120 1200,3050 1240,3050 1280,3010 1280,3000 1280,2961.79 U17.54@1279.21,2961
TX+: J4.9 U6.9 | length 226.2
  Top w10: J4.9@1825,500 1827,502 1827,537 1930,640 U6.9@1930,682.75
TX-: J4.10 U6.10 | length 347
  Top w10: J4.10@1825,400 1875,450 1875,522 1980,627 U6.10@1980,682.75
UART1_RXD: RXD1.P$1 RXD1.P$2 U6.2 U17.32 | length 1933.4
  Top w8: U17.32@1377.64,2519 1377.64,1942.36 2130,1190 RXD1.P$2@2130,1000 U6.2@2130,897.25
UART1_TXD: TXD1.P$1 TXD1.P$2 U6.5 U17.31 | length 1879.4
  Top w8: U17.31@1357.95,2519 1357.95,1932.05 1980,1310 TXD1.P$2@1980,1000 U6.5@1980,897.25
UART2_RXD: RXD2.P$2 U4.5 | length 562.9
  Top w8: U4.5@906,3330.12 U4.5@906.75,3329.37
  Top w10: RXD2.P$2@860,2855 860,2990 930,3060 v1(930,3118) ; U4.5@906,3330.12 v1(906,3354)
  Bottom w8: v1(906,3354) 930,3330
  Bottom w10: v1(930,3118) 930,3330
UART2_TXD: TXD2.P$2 U4.4 | length 294.9
  Top w8: U4.4@906.75,3309.69 907.07,3310 945,3310 950,3315 v1(970,3315)
  Bottom w8: v1(970,3315) 970,3220 955,3205 955,3180 975,3160 TXD2.P$2@975,3100
USB2DN-1_DM: R3.2 U19.6 | length 2569.7
  Top w6: v1(1896,2838) 1908,2850 1951.76,2850 U19.6@1952,2850.24
  Top w8: R3.2@348,1246 R3.2@348,1247.13 ; v1(348,1272) R3.2@348,1247.13 ; R3.2@350,1247.13 R3.2@348,1247.13
  GND+Signal w8: v1(1410,2210) 1412,2210 1438,2184 1580,2184 1687,2291 1687,2723 1756,2792 1850,2792 v1(1896,2838)
  Bottom w8: v1(348,1272) 348,1288 360,1300 430,1300 1340,2210 v1(1410,2210)
USB2DN-1_DP: R2.2 U19.5 | length 2623.2
  Top w6: v1(1864,2861) 1888,2861 1893,2866 U19.5@1952,2865.98
  Top w8: R2.2@350,1167.13 357.13,1167.13 v1(376,1184)
  GND+Signal w8: v1(1460,2210) 1580,2210 1670,2300 1670,2730 1749,2809 1843,2809 1864,2830 v1(1864,2861)
  Bottom w8: v1(376,1184) 376,1266 390,1280 440,1280 1340,2180 1430,2180 v1(1460,2210)
USB2DN-2_DM: J7.2 U7.1 U19.30 | length 2319.7
  Top w6: U19.30@2054.02,2512 2054.02,2539.02 v2(2075,2560)
  Top w10: J7.2@2458.43,3770 2470,3758.43 v1(2470,3690)
  PWR+Signal w8: v2(2710,2560) 2790,2640 v2(2790,3444)
  Bottom w8: v2(2075,2560) 2095,2580 2380,2580 2480,2470 2620,2470 v2(2710,2560) ; U7.1@2470,3647 v1(2470,3690) 2496,3716 2569,3716 2594,3691 2594,3640 2762,3471.5 2781.5,3471.5 2790,3463 v2(2790,3444)
  Bottom w10: U7.1@2470,3647 U7.1@2473,3644
USB2DN-2_DP: J7.3 U7.3 U19.29 | length 2200.7
  Top w6: U19.29@2038.27,2512 2038.27,2558.27 v2(2040,2560)
  Top w8: v1(2550,3690) 2580,3690 2590,3680 2590,3640 2757,3473 v2(2757,3444)
  Top w10: v1(2550,3690) 2550,3763.15 J7.3@2556.85,3770
  PWR+Signal w8: v2(2670,2560) 2770,2660 2770,3412 2757,3425 v2(2757,3444)
  Bottom w8: v2(2040,2560) 2040,2590 2050,2600 2390,2600 2490,2490 2600,2490 v2(2670,2560) ; U7.3@2550,3647 v1(2550,3690)
  Bottom w10: U7.3@2547,3644 U7.3@2550,3647
USB2DN-3_DM: J8.2 U8.1 U19.15 | length 1795
  Top w6: v2(1501,2736) 1512,2731 1626,2731 1663,2694 1803,2694 1829,2720 1884,2720 1895.5,2708.5 U19.15@1952,2708.5
  Top w8: v2(1640,3324) 1640,3570 v2(1670,3600) 1670,3758.43 J8.2@1658.43,3770
  PWR+Signal w8: v2(1501,2736) 1467,2736 1440,2763 1440,3270 1480,3310 1570,3310 1584,3324 v2(1640,3324)
  Bottom w8: v2(1670,3600) 1670,3557 U8.1@1673,3554
USB2DN-3_DP: J8.3 U8.3 U19.14 | length 1789.5
  Top w6: v2(1528,2755) 1625,2755 1671,2709 1797,2709 1823,2735 1891,2735 1901.75,2724.25 U19.14@1952,2724.25
  Top w8: v2(1665,3299) 1665,3514 v2(1747,3597) 1747,3760.15 J8.3@1756.85,3770
  PWR+Signal w8: v2(1528,2755) 1528,2783 1515,2796 1472,2796 1460,2808 1460,3260 1490,3290 1580,3290 1589,3299 v2(1665,3299)
  Bottom w8: U8.3@1747,3554 v2(1747,3597)
USB2DN-4_DM: J9.2 U9.1 U19.38 | length 2390.2
  Top w6: v2(1566,2708) 1566,2705 1588,2683 1600,2683 1742,2541 1742,2454 1766,2430 1852,2430 1888,2466 2166,2466 2180,2480 U19.38@2180,2512
  Top w8: v2(1800,3325) 1800,3400 1822,3422 v2(1822,3598)
  PWR+Signal w8: v2(1566,2708) 1566,2720 1560,2726 1560,2780 1480,2860 1480,3250 1500,3270 1680,3270 1735,3325 v2(1800,3325)
  Bottom w8: v2(1822,3598) 1868,3644 U9.1@1968,3644
  Bottom w10: U9.1@1968,3644 1968,3693 1980,3705 2012,3705 2052,3745 2052,3769.57 J9.2@2051.57,3770
USB2DN-4_DP: J9.3 U9.3 U19.37 | length 2591.4
  Top w6: v2@1599,2707 1757,2549 1757,2461 1773,2445 1845,2445 1880,2480 2160,2480 2164.25,2484.25 U19.37@2164.25,2512
  Top w8: v2(1598,2707) v2@1599,2707 ; v2(1830,3314) 1830,3402 1840,3412 1840,3552 1858,3570 v2(1858,3598)
  Top w10: v1@2004,3845 v1(2004,3842) 2004,3796 2070,3730 v1(2070,3660)
  PWR+Signal w8: v2(1598,2707) 1598,2718 1580,2736 1580,2790 1500,2870 1500,3240 1510,3250 1690,3250 1740,3300 1815,3300 1829,3314 v2(1830,3314)
  Bottom w8: v2(1858,3598) 1878,3618 1912,3618 1928,3602 2036,3602 2042,3608 U9.3@2042,3644
  Bottom w10: J9.3@1953,3770.15 J9.3@1953.15,3770 1955,3771.85 1955,3795 2002,3842 v1(2004,3842) v1@2001,3842 ; U9.3@2042,3644 2042,3660 v1(2070,3660)
USB2DN_VBUS1: C19.1 C43.1 R47.1 R58.2 U10.5 U15.1 VBUS1.P$1 | length 633.8
  Top w10: U15.1@267.4,1536.18 277.72,1546.5 C19.1@335,1546.5 ; R47.1@300,1612.87 300,1581.5 C19.1@335,1546.5 ; U10.5@487,1621.29 U10.5@487.4,1621.69 ; VBUS1.P$1@710,1660 650,1660 633.5,1643.5 C43.1@545,1643.5 523.19,1621.69 U10.5@487.4,1621.69 ; C19.1@335,1546.5 430.5,1546.5 442,1535 479,1535 490,1546 490,1568.87 R58.2@491.13,1570 491.13,1617.97 U10.5@487.4,1621.69
USB2DN_VBUS2: C54.1 C70.1 J7.1 U7.5 U11.5 VBUS2.P$1 | length 707.7
  Top w10: VBUS2.P$1@2185,3660 2186,3661 2186,3711 2205,3730 2230,3730 ; C70.1@2200,3820.47 2200,3760 2230,3730 ; C54.1@2336.5,3680 C54.1@2337,3680 ; J7.1@2360,3770 2361,3769 J7.1@2361,3730 ; U11.5@2360.71,3620 U11.5@2358.31,3622.4 2358,3622.71 2358,3659 C54.1@2337,3680 ; 2230,3730 J7.1@2361,3730 ; C54.1@2337,3680 2361,3704 J7.1@2361,3730
  Top w12: U11.5@2360.71,3620 v1(2410,3620)
  Bottom w12: v1(2410,3620) 2440,3590 2500,3590 2510,3580 U7.5@2510,3546
USB2DN_VBUS3: C52.1 C61.1 J8.1 U8.5 U12.5 VBUS3.P$1 | length 793.2
  Top w10: VBUS3.P$1@1380,3680 1380,3720 1390,3730 1428,3730 ; C52.1@1400,3820.47 1400,3758 1428,3730 ; U12.5@1558.31,3622.4 1558.31,3658.19 C61.1@1536.5,3680 1540,3680 1560,3700 J8.1@1560,3750 ; J8.1@1560,3770 J8.1@1560,3750 ; 1428,3730 1540,3730 J8.1@1560,3750
  Top w12: U12.5@1558.31,3622.4 1560.71,3620 v1(1610,3620)
  Bottom w12: v1(1610,3620) 1610,3540 1646,3504 1701,3504 1710,3495 U8.5@1710,3456
USB2DN_VBUS4: C51.1 C66.1 J9.1 U9.5 U13.5 VBUS4.P$1 | length 878.9
  Top w10: C66.1@1966.5,3580 2023,3580 2053,3550 2053,3517.71 U13.5@2053.31,3517.4 2065,3517.4 v1(2065,3486) ; VBUS4.P$1@2134,3486 2148,3486 VBUS4.P$1@2149,3487
  Top w12: v1(2065,3486) VBUS4.P$1@2134,3486
  Bottom w10: v1(2065,3486) 2100,3521 2100,3650 2138,3688 2138,3758 J9.1@2150,3770 2280,3770 2300,3790 C51.1@2300,3820.47
  Bottom w12: U9.5@2005,3546 2005,3500 2019,3486 v1(2065,3486)
USB2UP_DM: R43.1 U19.90 | length 96.2
  Top w6: U19.90@2148.5,2968 2149.5,2968.38 2149.5,3063 2149.63,3062.87 R43.1@2150,3062.87
USB2UP_DP: R18.1 U19.89 | length 105.5
  Top w6: U19.89@2164.25,2968 2164.25,3037.13 R18.1@2190,3062.87
USB3UP-A_RXDM: C63.2 U19.95 | length 1936.7
  Top w6: v2(2061.5,3009) 2069.76,3000.74 U19.95@2069.76,2968
  GND+Signal w6: v2(2061.5,3009) 2061.5,2943.5 2048,2930 2048,2912 2098,2862 2242,2862 2276,2896 2510,2896 2552,2938 v2(2564,2938)
  GND+Signal w8: v2(3146,3484) 3510,3484 v2(3520,3494)
  Bottom w8: v2(2564,2938) 2578,2938 3124,3484 v2(3146,3484) ; v2(3520,3494) 3554.5,3494 C63.2@3555,3493.5
USB3UP-A_RXDP: C64.2 U19.94 | length 1806.2
  Top w6: v2(2072,2921) 2086,2935 2086,2967.51 U19.94@2085.51,2968
  GND+Signal w6: v2(2072,2921) 2116,2877 2235,2877 2268,2910 2501,2910 v2(2565,2974)
  Bottom w8: v2(2565,2974) 2584,2974 3100,3490 3100,3870 3130,3900 3158.5,3900 C64.2@3160,3901.5
USB3UP-A_TXDM: C68.2 U19.92 | length 1984.4
  Top w6: v2(2106,2920.5) 2117.01,2931.49 U19.92@2117.01,2968
  GND+Signal w6: v2@2106,2920 2134,2892 2228,2892 2262,2926 2483,2926 v2(2564,3007)
  GND+Signal w8: v2@2106,2920 v2(2106,2920.5)
  Bottom w8: v2@2565,3007 v2(2564,3007) 2567,3007 2590,3030 2610,3030 3080,3500 3080,3890 3120,3930 3326.5,3930 C68.2@3355,3901.5
USB3UP-A_TXDP: C69.2 U19.91 | length 2048.6
  Top w6: U19.91@2132.76,2968 2133,2968 2133,2932 v2(2143,2922)
  GND+Signal w6: v2(2143,2922) 2188,2922 2203,2907 2222,2907 2256,2941 2463,2941 v2(2562,3040)
  Bottom w8: v2(2562,3040) 2589,3067 2616,3067 3059,3510 3059,3899 3110,3950 3406.5,3950 C69.2@3455,3901.5
VBUS_MON_UP: R22.1 R23.2 U19.80 | length 1108.4
  Top w6: 2306,2938 U19.80@2305.98,2968
  Top w8: 2306,2938 2314,2930 2370,2930 2470,3030 v2(2470,3060) ; v2(2930,3580) 2950,3580 2970,3600 2970,3627.87 R23.2@2967.87,3630 R22.1@2967.87,3680
  Bottom w8: v2(2470,3060) 2930,3520 v2(2930,3580)
VCC_RF: R57.2 U16.9 | length 486.6
  Top w12: R57.2@344.53,650 380,650 450,720 490,720 525,755 525,950 510,965 464.26,965 U16.9@463.76,964.49
VPP: PK3.2 R4.2 U17.7 | length 934
  Top w6: U17.7@1007.53,2770 U17.7@1009,2769.53
  Top w8: R4.2@887.13,2770 U17.7@1007.53,2770
  Top w12: PK3.2@163,2950 590,2950 730,2810 870,2810 887.13,2792.87 R4.2@887.13,2770
VPP_MB: J4.2 PK3.1 | length 4211.3
  Top w10: J4.2@2225,400 2310,485 2310,800 2280,830 v1(2280,1270)
  PWR+Signal w10: v1(730,2750) 730,2100 1230,1600 1950,1600 v1(2280,1270)
  Bottom w10: PK3.1@63,2950 113,2900 580,2900 v1(730,2750)
pads on no net: J1.7 J1.8 J2.10 J2.11 J2.12 J3.4 J3.5 J4.15 J4.16 J6.5 J6.6 J7.6 J7.7 J8.6 J8.7 J9.6 J9.7 PK3.11 PK3.12 U1.4 U3.4 U3.6 U6.1 U6.8 U6.13 U7.4 U7.6 U8.4 U8.6 U9.4 U9.6 U14.4 U15.4 U16.1 U16.2 U16.14 U16.17 U16.18 U16.19 U17.2 U17.3 U17.6 U17.8 U17.40 U17.43 U17.46 U17.47 U17.55 U17.58 U17.59 U17.60 U17.61 U19.2 U19.3 U19.4 U19.7 U19.8 U19.10 U19.11 U19.12 U19.13 U19.16 U19.17 U19.19 U19.20 U19.23 U19.27 U19.28 U19.31 U19.32 U19.34 U19.35 U19.36 U19.39 U19.40 U19.42 U19.43 U19.45 U19.46 U19.47 U19.48 U19.49 U19.50 U19.51 U19.52 U19.54 U19.57 U19.61 U19.66 U19.72 U19.73 U19.74 U19.75 U19.76 U19.77 U19.81 U19.82 U19.84 U19.85 U19.87 U19.88 U19.97

## Polygon pours and split planes (outlines as drawn)
GND on GND+Signal "Polygon_1_Net_GND" (solid, remove dead copper, pour order 3): 14,4136 3836,4136 3836,14 14,14
1.2V on PWR+Signal "Polygon_1_Net_1.2V" (solid, remove dead copper, pour order 1): 1805,2355 3005,2355 3005,2045 1515,2045 1515,3255 2705,3255 2705,2645 2595,2645 2595,3105 1805,3105
3.3V on PWR+Signal "Polygon_1_Net_3.3V" (solid, remove dead copper, pour order 0): 1845,3035 2555,3035 2555,2555 3355,2555 3355,2045 3045,2045 3045,2395 1845,2395
5V on PWR+Signal "Polygon_1_Net_5V" (solid, remove dead copper, pour order 2): 295,675 2305,675 2305,1102.03 1912.11,1505 615,1505 615,2535 1425,2535 1425,3415 2875,3415 2875,2595 3355,2595 3355,3725 295,3725

## Keep-outs
Keep-Out Layer:
  the board outline again, w0

## Silkscreen, mask and mechanical layers (free items; w line width, h text height)
Top Overlay:
  region: 3760,1400 3630,1400 3630,1800 3760,1800
  lines w8: 3620,575 3700,670 3790,590 3718,590 3718,625 3682,625 3682,525 3718,525 3718,560 3790,560 3700,480 3620,575
  text "TransTech Systems, Inc" at 3657,695 h29.75 r90
  text "PCB: 1700-0002 REV. A" at 3707,695 h29.75 r90
  text "PCA: 7500-0428 REV. A" at 3757,695 h29.75 r90
Dimension:
  the board outline again, w0
tPlace:
  lines w6: 219,1279 310,1279 333,1257 ; 219,1339 340,1339 358,1322 ; 282,1100 318,1100 336,1118 ; 2194,3114 2200,3120 2200,3150
ENG_NOTES:
  drawing of 177 lines, arcs and shapes, not listed
  text "EXT." at 880.06,4395.3 h85
  text "USB 2.0" at 1853.44,4390.3 h85
  text "(3 Nanofits)" at 1793.41,4255.3 h68
  text "SERIAL" at 140.93,4245.3 h85
  text "TEMP" at 858.82,4245.3 h85
  text "USB 3.0" at 3083.44,4245.3 h85
  text "AUX SPI" at -630.36,3366.01 h85
  text "PICKIT3" at -625.36,2651.01 h85
  text "INPUT PWR" at 4066.4,2455.3 h85
  text "& REG CKTS" at 4066.4,2305.3 h85
  text "AUX SPI" at -625.36,1911.01 h85
  text "G N S S" at -615.08,844.61 h85
  text "MEAS. BRD" at 1538.47,-458.27 h85

## Dimensions
449,270 to 3402,270 on tFinish
3402,270 to 3402,3223 on tFinish
0,4150 to 3850,4150 on tFinish
3850,4150 to 3850,0 on tFinish

## Text inside footprints (layer, text, board x,y; h text height)
5V_ON: tPlace "K" at 3705,1995 h29.75 r180
GNSSPULSE: tPlace "K" at 1100,1025 h25.5 r180
J1: tPlace "1" at 3548,2835 h68 r90
J2: tPlace "5" at 3680,3710 h42.5 r180; tPlace "1" at 3070,3710 h42.5 r180
J3: tPlace "1" at 180,3800 h42.5 r180
J4: tPlace "1" at 2675,550 h51 r180; tPlace "14" at 1512.01,378.99 h42.52; tPlace "13" at 1512.07,478.78 h42.58; tPlace "2" at 2277.12,372.97 h42.55; tPlace "1" at 2277.58,472.92 h42.53
J6: tPlace "1" at 770,3800 h42.5 r180
J7: tPlace "1" at 2240,3780 h42.5 r180
J8: tPlace "1" at 1440,3780 h42.5 r180
J9: tPlace "1" at 2270,3780 h42.5 r180
J10: tPlace "1" at 110,2220 h42.5 r270
J11: tPlace "1" at 110,3675 h42.5 r270
J12: tPlace "1" at 2073,1720 h42.5 r90
PK3: tPlace "2" at 138,3050 h42.5 r270; tPlace "1" at 38,3050 h42.5 r270
Q1: tPlace "1" at 3107,2842 h29.75 r90
Q5: tPlace "1" at 1662,883 h29.75
R52: Measures "0.022in/0.559mm" at 3478,3398 h21.25 r270; Measures "0.085in/2.159mm" at 3798,3429 h21.25 r270; Measures "0.055in/1.397mm" at 3638,3108 h21.25 r270; Measures "Alt 2 Padstyle: OX90Y60D30P" at 3232,3853 h42.5 r270; Measures "Alt 1 Padstyle: OX60Y90D30P" at 3292,3853 h42.5 r270; Measures "Default Padstyle: RX30Y55D0T" at 3352,3869 h42.5 r270
R53: Measures "0.022in/0.559mm" at 62,2948 h21.25; Measures "0.085in/2.159mm" at 31,3268 h21.25; Measures "0.055in/1.397mm" at 352,3108 h21.25; Measures "Alt 2 Padstyle: OX90Y60D30P" at -393,2702 h42.5; Measures "Alt 1 Padstyle: OX60Y90D30P" at -393,2762 h42.5; Measures "Default Padstyle: RX30Y55D0T" at -409,2822 h42.5
R54: Measures "0.022in/0.559mm" at 372,102 h21.25 r90; Measures "0.085in/2.159mm" at 52,71 h21.25 r90; Measures "0.055in/1.397mm" at 212,392 h21.25 r90; Measures "Alt 2 Padstyle: OX90Y60D30P" at 618,-353 h42.5 r90; Measures "Alt 1 Padstyle: OX60Y90D30P" at 558,-353 h42.5 r90; Measures "Default Padstyle: RX30Y55D0T" at 498,-369 h42.5 r90
R55: Measures "0.022in/0.559mm" at 3822,102 h21.25 r90; Measures "0.085in/2.159mm" at 3502,71 h21.25 r90; Measures "0.055in/1.397mm" at 3662,392 h21.25 r90; Measures "Alt 2 Padstyle: OX90Y60D30P" at 4068,-353 h42.5 r90; Measures "Alt 1 Padstyle: OX60Y90D30P" at 4008,-353 h42.5 r90; Measures "Default Padstyle: RX30Y55D0T" at 3948,-369 h42.5 r90
U1: tPlace "1" at 3274,2442 h29.75
U2: tPlace "1" at 2890,2446 h25.5
U3: tPlace "1" at 3260,3519 h25.5
U4: tPlace "1" at 894,3242 h25.5 r270
U5: tPlace "1" at 2626,882 h29.75
U6: tPlace "1" at 2195,882 h29.75
U7: tPlace "1" at 2460,3639 h25.5
U8: tPlace "1" at 1660,3549 h25.5
U9: tPlace "1" at 1955,3639 h25.5
U10: tPlace "1" at 504,1705 h25.5
U11: tPlace "1" at 2275,3639 h25.5 r90
U12: tPlace "1" at 1475,3639 h25.5 r90
U13: tPlace "1" at 1970,3534 h25.5 r90
U14: tPlace "1" at 1192,1311 h29.75 r270
U15: tPlace "1" at 284,1527 h29.75
U16: tPlace "13" at 948.03,806.85 h29.75 r180; tPlace "12" at 451.97,806.85 h29.75 r180; tPlace "24" at 948.03,1413.15 h29.75 r180; tPlace "1" at 451.97,1413.15 h29.75 r180
U17: tPlace "33" at 1437,2543 h29.75; tPlace "49" at 1389,2949 h29.75; tPlace "17" at 1073,2495 h29.75; tPlace "1" at 1023,2899 h29.75
U19: tPlace "76" at 2376,2988 h29.75; tPlace "51" at 2426,2506 h29.75; tPlace "26" at 1984,2456 h29.75; tPlace "1" at 1936,2940 h29.75